# Altium PCB PCB_TESIS.PcbDoc
Units mm, origin at the board's own origin, x right, y up, seen from the top; angles counter-clockwise.
Board outline 100 x 100 mm, 2 copper layers (Top Layer, Bottom Layer), stack 1.671 mm thick; 46 components, 40 nets, 168 pads, 0 vias.
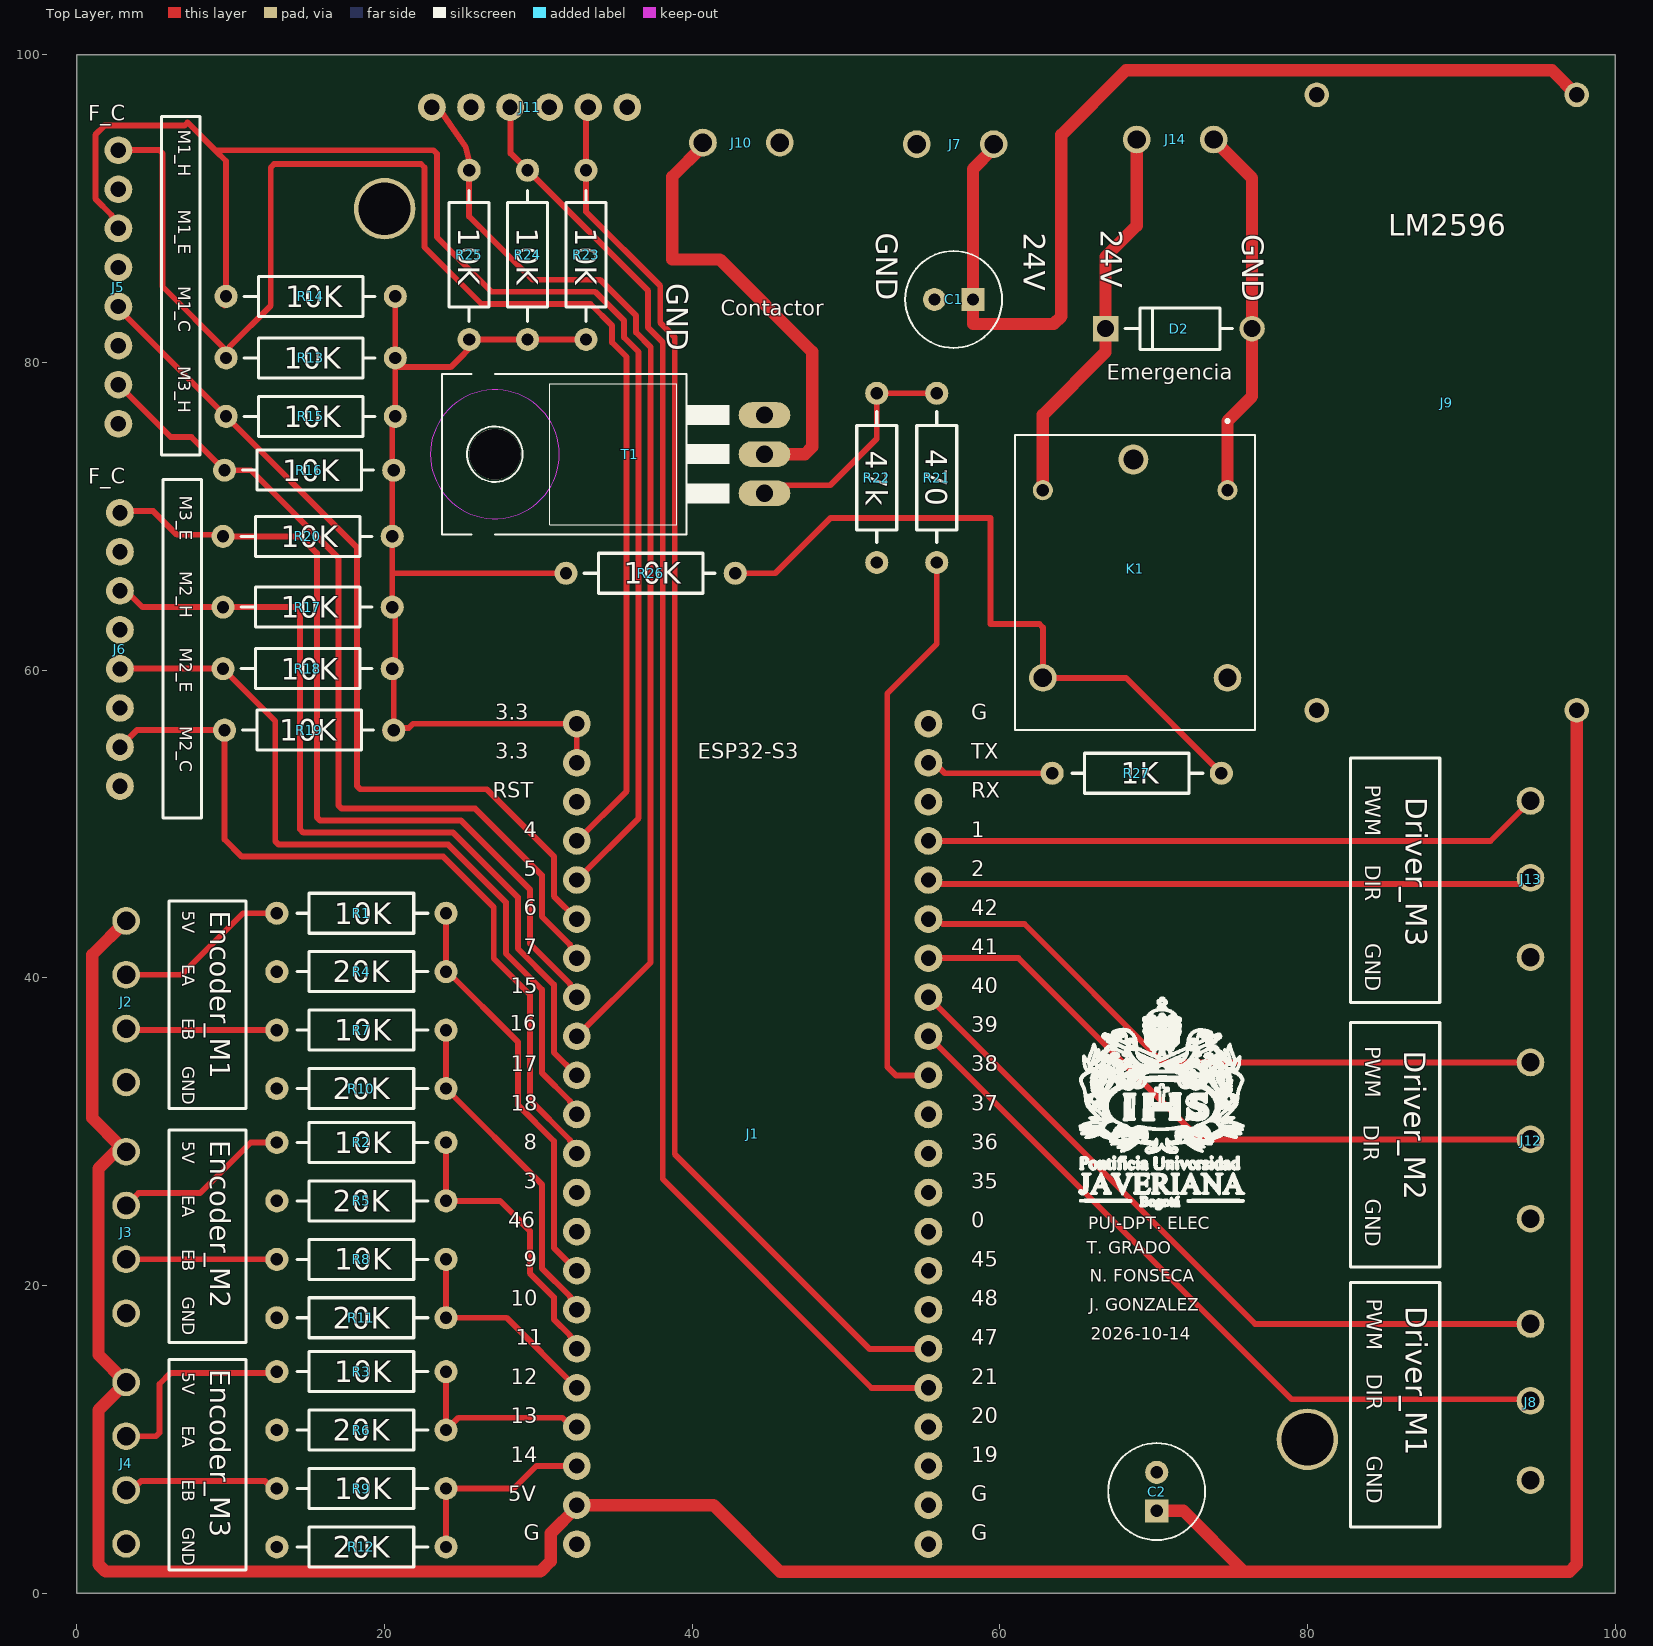
[diagram p0: Top Layer view]
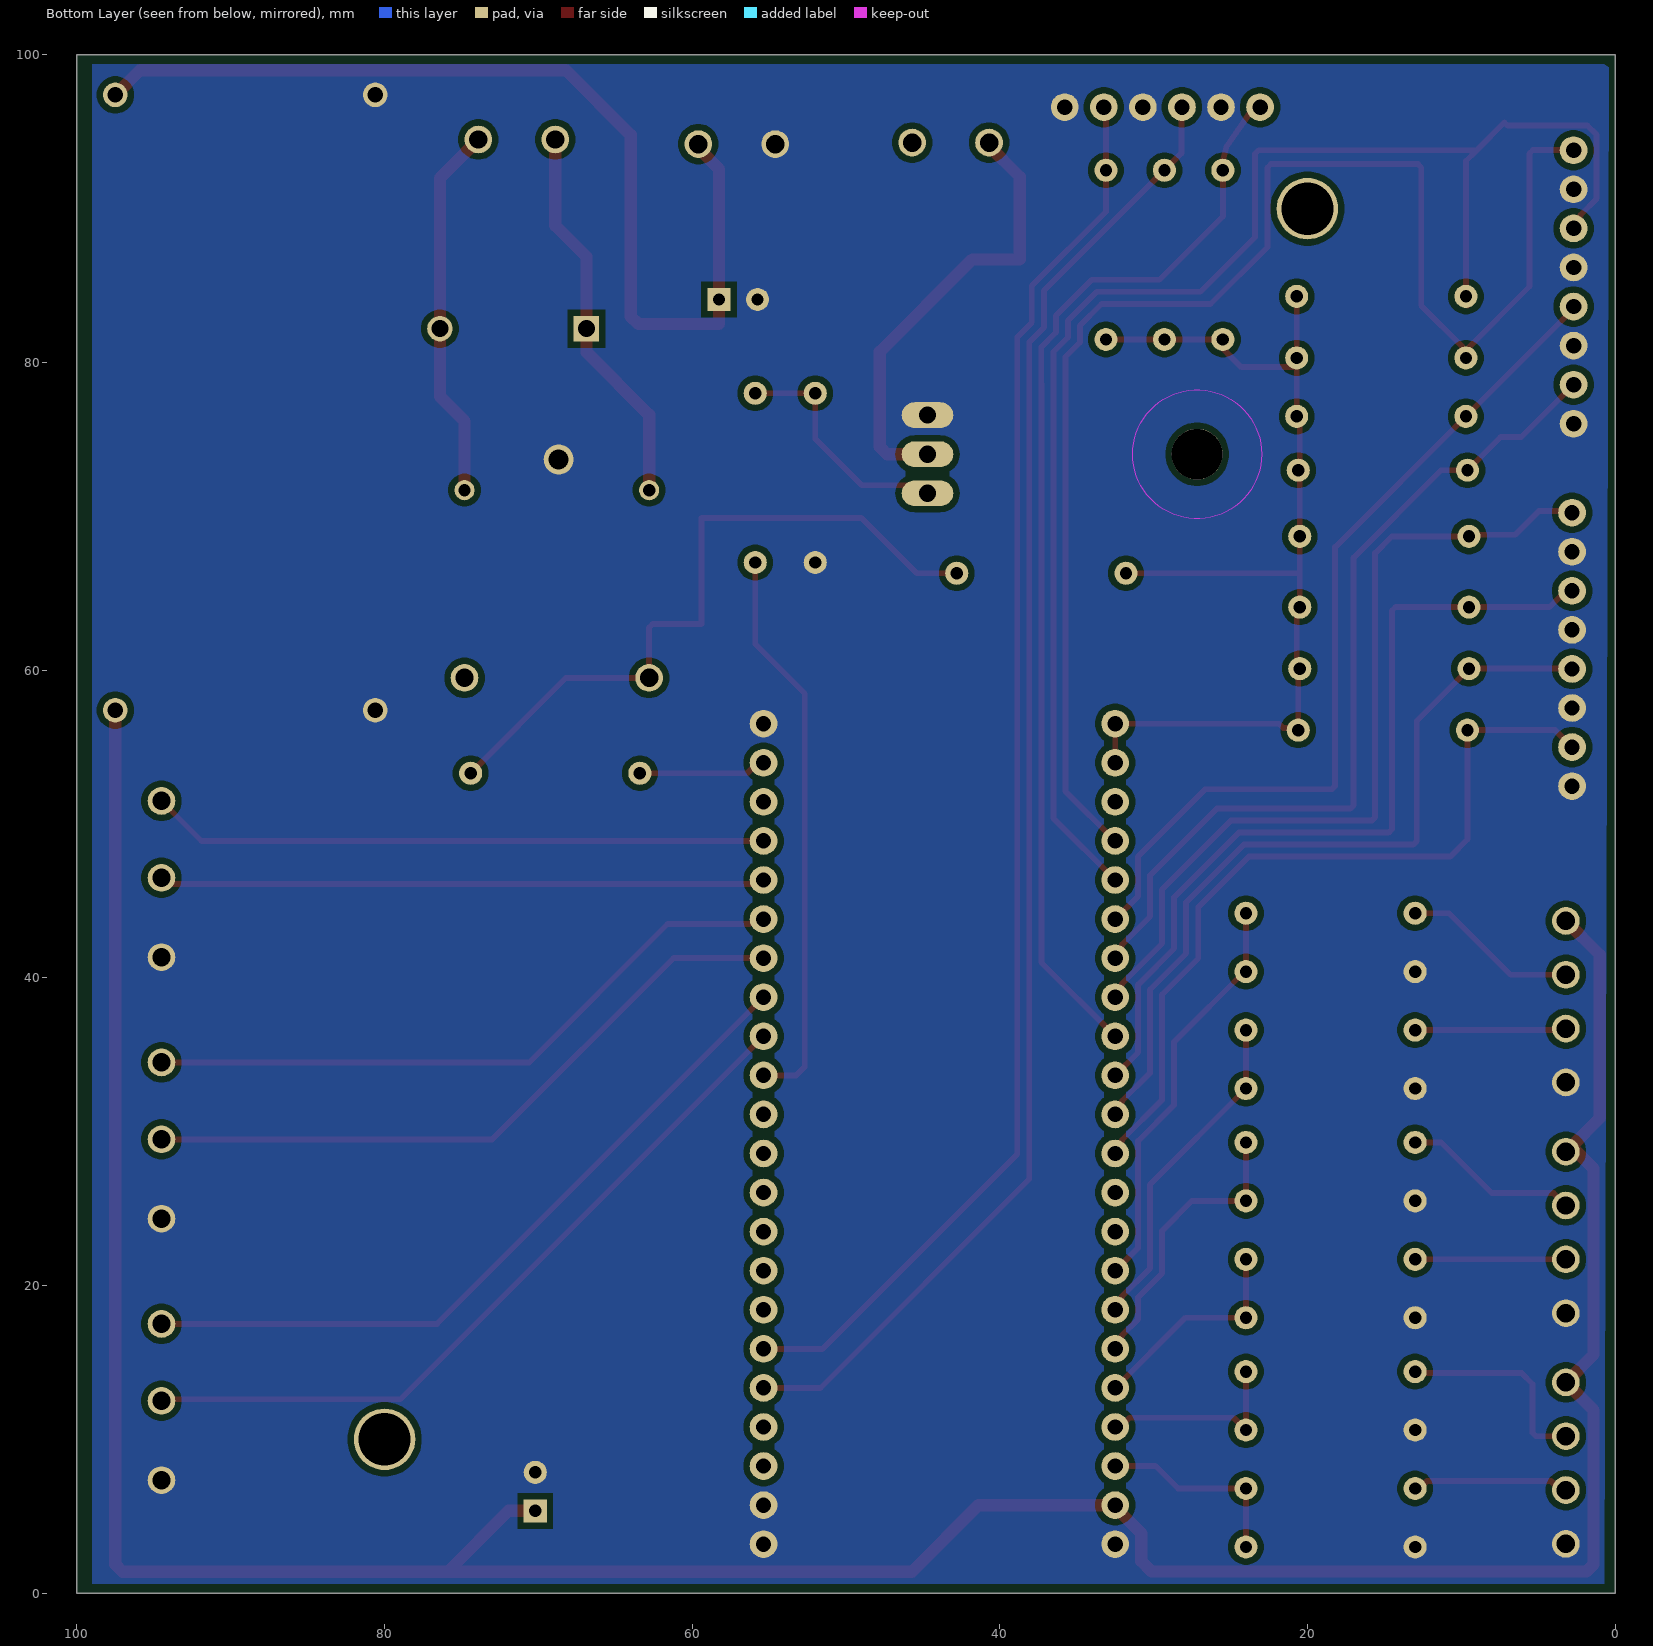
[diagram p1: Bottom Layer view, seen from below]

## Layer stack, top to bottom
Top Solder: solder mask 0.0102, Solder Resist, Dk 3.5
Top Layer: signal copper 0.0356
Dielectric 1: dielectric 1.6, FR-4, Dk 4.8
Bottom Layer: signal copper 0.0356
Bottom Solder: solder mask 0.0102, Solder Resist, Dk 3.5

## Board outline
0,0 0,100 100,100 100,0

## Design rules (kind name [scope] priority, off if disabled: settings)
BoardOutlineClearance [All] p1: gap=0.254 ignorepadtopadclearanceinfootprint=FALSE
Clearance [All] p1: gap=0.4 ignorepadtopadclearanceinfootprint=FALSE
HoleSize [All] p1: absolutevalues=TRUE maxlimit=6 minlimit=0.4 maxpercent=80.000 minpercent=20.000
MinimumAnnularRing [All] p1: minimumring=0.254
PlaneConnect [All] p1: planeconnectstyle=Direct reliefexpansion=0.508 reliefentries=4 reliefconductorwidth=0.254 reliefairgap=0.254
PolygonConnect [All] p1: connectstyle=Direct reliefconductorwidth=0.4 reliefentries=4 polygonreliefangle="90 Angle" airgapwidth=0.4
RoutingLayers [All] p1: top layer_v5=TRUE bottom layer_v5=FALSE
RoutingVias [All] p1: holewidth=0.711 width=1.27 viastyle="Through Hole" minholewidth=0.711 minwidth=1.27 maxholewidth=0.711 maxwidth=1.27
SolderMaskExpansion [All] p1: expansion=0.102 istentingtop=FALSE
SupplyNets "Schematic Supply Nets_5" [InNet('GND_F')] p1: voltage=0.000
SupplyNets "Schematic Supply Nets_1" [InNet('VCC 24V_F')] p2: voltage=0.000
SupplyNets "Schematic Supply Nets_3" [InNet('VCC 24V')] p3: voltage=0.000
SupplyNets "Schematic Supply Nets_4" [InNet('GND')] p4: voltage=0.000
SupplyNets "Schematic Supply Nets_2" [InNet('+3.3')] p5: voltage=0.000
SupplyNets "Schematic Supply Nets" [InNet('+5')] p6: voltage=0.000
UnRoutedNet [All] p1: checkbadconnections=TRUE
Width [All] p1: maxlimit=0.8 minlimit=0.3 preferedwidth=0.4
Width Width_power [InNet('VCC 24V') Or InNet('+5')] p2: maxlimit=1.2 minlimit=0.6 preferedwidth=0.8 minimp=50.000000 maximp=50.000000 favimp=50.000000
26 further rules are at their usual default settings.

## Components (designator, comment, footprint, x,y, rotation, side; value= is the part's Value field where it differs from the comment)
C1 "47uF" CAPPRD250W50D630H1120 57,84.1 r180 top
C2 "47uF" CAPPRD250W50D630H1120 70.2,6.6 r90 top
D2 "1N4007" DIOAD1060W80L520D270 71.7,82.2 r0 top
J1 "Esp32-S3" FOOTPRINTESP 32.5,56.52 r0 top
J2 "Encoder_M1" BORNERA4_3.5MM 3.2,33.2 r180 top
J3 "Encoder_M2" BORNERA4_3.5MM 3.2,18.2 r180 top
J4 "Encoder_M3" BORNERA4_3.5MM 3.2,3.2 r180 top
J5 "Finales de carrera" "FOOTPRINT BORNERA 8 PINS" 2.7,93.8 r0 top
J6 "Finales de carrera" "FOOTPRINT BORNERA 8 PINS" 2.8,70.24 r0 top
J7 "Alimentacion" "BORNERA 2 5MM" 59.6,94.2 r270 top
J8 "Driver_M1" "BORNERA 3 5MM" 94.5,17.5 r0 top
J9 "BUCK_LM2596" BUCK_LM2596 80.6,97.4 r0 top
J10 "Contactor" "BORNERA 2 5MM" 45.7,94.3 r270 top
J11 "Botones" "FOOTPRINT BORNERA 6" 23.08,96.6 r90 top
J12 "Driver_M2" "BORNERA 3 5MM" 94.5,34.5 r0 top
J13 "Driver_M3" "BORNERA 3 5MM" 94.5,51.5 r0 top
J14 "Bornera_Fusibles" "Bornera 2 5mm" 68.9,94.5 r90 top
K1 "SRD-24VDC-SL-C" RELAY_SRD-12VDC-SL-C 68.8,65.6 r270 top
R1 "10K" RESAD1100W55L680D260 18.5,44.2 r0 top
R2 "10K" RESAD1100W55L680D260 18.5,29.3 r0 top
R3 "10K" RESAD1100W55L680D260 18.5,14.4 r0 top
R4 "20K" RESAD1100W55L680D260 18.5,40.4 r0 top
R5 "20K" RESAD1100W55L680D260 18.5,25.5 r0 top
R6 "20K" RESAD1100W55L680D260 18.5,10.6 r0 top
R7 "10K" RESAD1100W55L680D260 18.5,36.6 r0 top
R8 "10K" RESAD1100W55L680D260 18.5,21.7 r0 top
R9 "10K" RESAD1100W55L680D260 18.5,6.8 r0 top
R10 "20K" RESAD1100W55L680D260 18.5,32.8 r0 top
R11 "20K" RESAD1100W55L680D260 18.5,17.9 r0 top
R12 "20K" RESAD1100W55L680D260 18.5,3 r0 top
R13 "10K" RESAD1100W55L680D260 15.2,80.3 r180 top
R14 "10K" RESAD1100W55L680D260 15.2,84.3 r180 top
R15 "10K" RESAD1100W55L680D260 15.2,76.5 r180 top
R16 "10K" RESAD1100W55L680D260 15.1,73 r180 top
R17 "10K" RESAD1100W55L680D260 15,64.1 r180 top
R18 "10K" RESAD1100W55L680D260 15,60.1 r180 top
R19 "10K" RESAD1100W55L680D260 15.1,56.1 r180 top
R20 "10K" RESAD1100W55L680D260 15,68.7 r180 top
R21 "470" RESAD1100W55L680D260 55.9,72.5 r90 top
R22 "47k" RESAD1100W55L680D260 52,72.5 r90 top
R23 "10K" RESAD1100W55L680D260 33.1,87 r270 top
R24 "10K" RESAD1100W55L680D260 29.3,87 r270 top
R25 "10K" RESAD1100W55L680D260 25.5,87 r270 top
R26 "10K" RESAD1100W55L680D260 37.3,66.3 r180 top
R27 "1K" RESAD1100W55L680D260 68.9,53.3 r0 top
T1 "TIP122" TO220 38.35,74.04 r90 top

## Footprints (in the part's own frame and the unit in brackets; to place one, negate y for a bottom-side part, rotate by r counter-clockwise, add the part's x,y. Pads: shape width x height; smd on the part's side, far side on the other; paste and mask are expansions set on the pad)
BORNERA4_3.5MM [mm] "header 22 pads"
  round 1.8 hole 1.2: 1(0,0) 2(0,-3.5) 3(0,-7) 4(0,-10.5)
  body extent -3.4,-12.4 3.4,1.9, height 8.4
"BORNERA 2 5MM" [mm] "header 22 pads"
  round 1.8 hole 1.2: 1(0,0) 2(0,-5)
  body extent -5.75,-7.61 5.45,3.1, height 18
"Bornera 2 5mm" [mm] "header 22 pads"
  round 1.8 hole 1.2: 1(0,0) 2(0,-5)
  body extent -5.75,-7.61 5.45,3.1, height 18
"BORNERA 3 5MM" [mm] "header 22 pads"
  round 1.8 hole 1.2: 1(0,0) 2(0,-5) 3(0,-10.16)
  body extent -5.7,-13.15 5.5,2.64, height 18
BUCK_LM2596 [mm]
  round 1.6 hole 1: IN+(16.9,0) IN-(0,0) OUT+(16.9,-40) OUT-(0,-40)
  body extent -1.6,-41.5 18.4,1.5, height 16.29
CAPPRD250W50D630H1120 [mm]
  round 1.5 hole 0.8: N(1.25,0)
  rect 1.5x1.5 hole 0.8: P(-1.25,0)
  silkscreen extent -3.15,-3.15 3.15,3.15, body extent -3.15,-3.15 3.15,3.15, height 11.2
DIOAD1060W80L520D270 [mm]
  round 1.65 hole 1.1 mask+0.102: A(4.699,0)
  rect 1.65x1.65 / inner round 1.65 / far side rect 1.65x1.65 hole 1.1 mask+0.102: C(-4.826,0)
  silkscreen extent -3.56,-1.35 3.43,1.35, body extent -5.29,-1.36 5.29,1.36, height 2.71
"FOOTPRINT BORNERA 6" [mm] "header 22 pads"
  round 1.8 hole 1: 1(0,0) 2(0,-2.54) 3(0,-5.08) 4(0,-7.62) 5(0,-10.16) 6(0,-12.7)
  body extent -3,-14.22 3.5,1.42, height 8.5
"FOOTPRINT BORNERA 8 PINS" [mm] "Footprint bornera 8 pins"
  round 1.8 hole 1: 1(0,0) 2(0,-2.54) 3(0,-5.08) 4(0,-7.62) 5(0,-10.16) 6(0,-12.7) 7(0,-15.24) 8(0,-17.78)
  body extent -3,-19.26 3.5,1.46, height 8.5
FOOTPRINTESP [mm] "header ESP-S3"
  round 1.8 hole 1: 1(0,0) 2(0,-2.54) 3(0,-5.08) 4(0,-7.62) 5(0,-10.16) 6(0,-12.7) 7(0,-15.24) 8(0,-17.78) 9(0,-20.32) 10(0,-22.86) 11(0,-25.4) 12(0,-27.94) 13(0,-30.48) 14(0,-33.02) 15(0,-35.56) 16(0,-38.1) 17(0,-40.64) 18(0,-43.18) 19(0,-45.72) 20(0,-48.26) 21(0,-50.8) 22(0,-53.34) 23(22.86,0) 24(22.86,-2.54) 25(22.86,-5.08) 26(22.86,-7.62) 27(22.86,-10.16) 28(22.86,-12.7) 29(22.86,-15.24) 30(22.86,-17.78) 31(22.86,-20.32) 32(22.86,-22.86) 33(22.86,-25.4) 34(22.86,-27.94) 35(22.86,-30.48) 36(22.86,-33.02) 37(22.86,-35.56) 38(22.86,-38.1) 39(22.86,-40.64) 40(22.86,-43.18) 41(22.86,-45.72) 42(22.86,-48.26) 43(22.86,-50.8) 44(22.86,-53.34)
  body extent -1.3,-61.96 24.1,7.68, height 16.29
RELAY_SRD-12VDC-SL-C [mm]
  round 1.308 hole 0.8: COIL1(-6.1,6) COIL2(-6.1,-6)
  round 1.95 hole 1.3: COM(-8.1,-0.12)
  round 1.8 hole 1.2: NC(6.1,6) NO(6.1,-6)
  silkscreen extent -10.7,-7.8 9.5,7.8, body extent -9.6,-7.8 9.6,7.8, height 15.8
RESAD1100W55L680D260 [mm]
  round 1.5 hole 0.8: 1(-5.5,0) 2(5.5,0)
  silkscreen extent -4.19,-1.3 4.32,1.3, body extent -5.77,-1.2 5.77,1.2, height 2.4
TO220 [mil]
  oval 66x132 hole 44: 1(-100,-250) 2(0,-250) 3(100,-250)
  round 130 hole 130 unplated: ""(0,440)
  Keep-Out Layer circle w0: c0,440 r165
  Keep-Out Layer circle w0: c0,440 r165
  silkscreen extent -205,-160 205,575, body extent -202,-318 195,-142, height 781

## Part data
C1 C2: library part ECA1HM470, "47ÂµF 50V Aluminum Electrolytic Capacitors Radial, Can 2000 Hrs @ 85Â°C", Package="RADIAL-2 Panasonic", Availability="In Stock", Check_prices=https://www.snapeda.com/parts/ECA1HM470/Panasonic%20Electronic%20Components/view-part/562975/?ref=eda, MF="Panasonic Electronic", MP=ECA1HM470, Price=None, Purchase-URL=https://pricing.snapeda.com/search/part/ECA1HM470/?ref=eda, SnapEDA_Link=https://www.snapeda.com/parts/ECA1HM470/Panasonic%20Electronic%20Components/view-part/562975/?ref=snap
D2: "Diode, DO-41, 1000V, 1A, 175Â°C", Package="DO-41 Diotec", Check_prices=https://www.snapeda.com/parts/1N4007/Diotec/view-part/?ref=eda, MF="Diotec Semiconductor", MP=1N4007, SnapEDA_Link=https://www.snapeda.com/parts/1N4007/Diotec/view-part/?ref=snap
J1: library part ESP32-S3
J2 J3 J4: library part Bornera4_3.5mm
J5 J6: library part Bornera8
J7 J10 J14: library part Bornera2_5mm
J8 J12 J13: library part Bornera3_5mm
J11: library part Bornera6
K1: library part SRD-12VDC-SL-C, "General Purpose Non Latching 12VDC SPDT Through Hole Relays RoHS", Package="NON STANDARD-5 Songle Relay", Check_prices=https://www.snapeda.com/parts/SRD-12VDC-SL-C/Songle+Relay/view-part/?ref=eda, MF="Songle Relay", MP=SRD-12VDC-SL-C, SnapEDA_Link=https://www.snapeda.com/parts/SRD-12VDC-SL-C/Songle+Relay/view-part/?ref=snap
R1 R2 R3 R4 R5 R6 R7 R8 R9 R10 R11 R12 R13 R14 R15 R16 R17 R18 R19 R20 R23 R24 R25 R26: "10.2 kOhms Â±1% 0.25W, 1/4W Through Hole Resistor Axial - Metal Film", Package="RADIAL-2 YAGEO", Check_prices=https://www.snapeda.com/parts/MFR-25FBF52-10K/Yageo/view-part/?ref=eda, MF=Yageo, MP=MFR-25FBF52-10K, SnapEDA_Link=https://www.snapeda.com/parts/MFR-25FBF52-10K/Yageo/view-part/?ref=snap
R21: library part 220, "10.2 kOhms Â±1% 0.25W, 1/4W Through Hole Resistor Axial - Metal Film", Package="RADIAL-2 YAGEO", Check_prices=https://www.snapeda.com/parts/MFR-25FBF52-10K/Yageo/view-part/?ref=eda, MF=Yageo, MP=MFR-25FBF52-10K, SnapEDA_Link=https://www.snapeda.com/parts/MFR-25FBF52-10K/Yageo/view-part/?ref=snap
R22 R27: library part 10K, "10.2 kOhms Â±1% 0.25W, 1/4W Through Hole Resistor Axial - Metal Film", Package="RADIAL-2 YAGEO", Check_prices=https://www.snapeda.com/parts/MFR-25FBF52-10K/Yageo/view-part/?ref=eda, MF=Yageo, MP=MFR-25FBF52-10K, SnapEDA_Link=https://www.snapeda.com/parts/MFR-25FBF52-10K/Yageo/view-part/?ref=snap
T1: "Bipolar (BJT) Transistor NPN - Darlington 100 V 5 A - 2 W Through Hole TO-220-3", Package="TO-220-3 ON Semiconductor", Check_prices=https://www.snapeda.com/parts/TIP122/Onsemi/view-part/?ref=eda, MF="ON Semiconductor", MP=TIP122, SnapEDA_Link=https://www.snapeda.com/parts/TIP122/Onsemi/view-part/?ref=snap

## Free pads (board coordinates)
  round 4 hole 3.4: 1(20,90) 1(80,10)

## Nets (pads, with @x,y where several pads share a name; then routed paths per layer and width w, separated by ;. In a path a pad name is that pad's centre, name@x,y a point inside that pad or via, vN(x,y) a via of type N, cw(c..) or ccw(c..) an arc to the next point about the centre after c; other vN are vias at no path point)
+3.3: J1.1 J1.2 R13.1 R14.1 R15.1 R16.1 R17.1 R18.1 R19.1 R20.1 R23.2 R24.2 R25.2 R26.2 | length 68.4
  Top Layer w0.381: R19.1@20.019,56.097 R19.1@20.435,55.681 ; R14.1@20.35,84.75 R14.1@20.4,84.7 ; R13.1@20.5,79.923 R13.1@20.7,79.723 ; R14.1 R13.1 R13.1@20.7,79.723 ; R26.2 20.6,66.3 20.5,66.4 ; J1.2 J1.1 21.857,56.52 21.572,56.235 20.735,56.235 R19.1 20.6,56.235 20.6,60 R18.1 20.7,60.3 20.7,63.9 R17.1 20.5,66.4 ; R23.2@32.85,81.25 32.6,81.5 R24.2 26.1,81.5 24.3,79.7 20.723,79.7 R13.1@20.7,79.723 ; 20.5,66.4 R20.1 20.5,73 20.5,76.5 20.698,76.698 20.698,78.798 20.7,78.8 R13.1@20.7,79.723
+5: C2.P J1.21 J2.4 J3.4 J4.4 J9.OUT+ | length 210
  Top Layer w0.8: J3.4@2.85,29.05 J3.4@2.845,29.045 ; J3.4 3.19,28.7 J3.4@2.845,29.045 ; J2.4 1,41.5 1,30.89 J3.4@2.845,29.045 ; C2.P 71.931,5.35 75.891,1.39 ; J9.OUT+@97.5,57.194 97.5,1.859 97.031,1.39 75.891,1.39 ; J3.4@2.845,29.045 1.4,27.6 1.4,15.5 J4.4 1.4,11.9 1.4,1.869 1.869,1.4 30.131,1.4 30.8,2.069 30.8,3.884 32.5,5.584 J1.21 41.38,5.72 45.71,1.39 75.891,1.39
+FC_M1_C: J1.6 J5.5 R15.2 | length 57.1
  Top Layer w0.381: J5.5@2.7,83.66 2.7,83.5 R15.2 ; R15.2@9.6,76.6 18.2,68 18.2,52.483 18.423,52.259 26.647,52.259 31.009,47.897 31.009,45.31 J1.6
+FC_M1_E: J1.5 J5.3 R14.2 | length 98.7
  Top Layer w0.381: J5.3 2.7,89.104 2.257,89.547 2.257,89.596 1.2,90.652 1.2,94.8 1.8,95.4 7,95.4 7.2,95.6 9,93.8 ; R14.2@9.2,84.1 R14.2@9.607,83.693 ; R14.2 9.7,93.1 9,93.8 ; J1.5 36.519,50.379 36.519,78.919 36.521,78.921 36.521,80.679 35.577,81.623 35.577,82.714 33.691,84.6 26.958,84.6 23.4,88.158 23.4,91.3 23.409,91.309 23.409,93.577 23.186,93.8 9,93.8
+FC_M1_H: J1.4 J5.1 R13.2 | length 96.1
  Top Layer w0.381: J5.1@2.7,93.82 5.337,93.82 5.561,93.597 5.561,84.939 R13.2@9.7,80.8 ; R13.2 R13.2@9.7,80.8 ; J1.4 35.738,52.138 35.738,79.242 35.741,79.245 35.741,80.355 34.796,81.3 34.796,82.391 33.387,83.8 26.3,83.8 22.6,87.5 22.6,92.677 22.377,92.9 12.823,92.9 12.6,92.677 12.6,83.7 9.914,81.014 9.914,80.817 9.897,80.8 R13.2@9.7,80.8
+FC_M2_C: J1.12 J6.7 R19.2 | length 51.9
  Top Layer w0.381: J6.7 3.9,56.1 R19.2 9.6,49 10.724,47.876 23.815,47.876 27.105,44.586 27.105,41.254 29.447,38.911 29.447,32.065 32.057,29.456 32.057,29.407 32.5,28.964 J1.12
+FC_M2_E: J1.11 J6.5 R18.2 | length 51.9
  Top Layer w0.381: J6.5@2.94,60.34 3.18,60.1 R18.2 ; R18.2@9.765,60.1 R18.2 ; J1.11 32.5,31.504 32.057,31.947 32.057,31.996 30.228,33.824 30.228,39.235 27.886,41.578 27.886,44.91 24.138,48.657 13.123,48.657 12.9,48.88 12.9,56.7 R18.2
+FC_M2_H: J1.10 J6.3 R17.2 | length 55.5
  Top Layer w0.381: J6.3@3,65.36 4.26,64.1 R17.2 14.277,64.1 14.5,63.877 14.5,49.661 14.723,49.438 24.462,49.438 28.667,45.233 28.667,41.901 31.009,39.558 31.009,35.15 J1.10
+FC_M3_E: J1.8 J6.1 R20.2 | length 55.2
  Top Layer w0.381: J6.1@2.8,70.34 4.96,70.34 6.5,68.8 9.1,68.8 9.2,68.7 14.51,68.7 15.6,67.61 15.6,50.442 15.823,50.219 24.981,50.219 29.448,45.752 29.448,42.225 32.057,39.616 32.057,39.567 32.5,39.124 J1.8
+FC_M3_H: J1.7 J5.7 R16.2 | length 56.5
  Top Layer w0.381: J5.7 6.1,75.16 7.44,75.16 R16.2 11.315,73 17,67.315 17,51.223 17.223,51 25.9,51 30.228,46.672 30.228,43.984 32.057,42.156 32.057,42.107 32.5,41.664 J1.7
-A2_Contactor: J10.2 T1.2 | length 29.5
  Top Layer w0.8: J10.2 40.7,94.073 38.701,92.074 38.701,86.7 41.8,86.7 47.8,80.7 47.8,74.509 47.331,74.04 T1.2
Contactor: J1.32 R21.1 | length 37
  Top Layer w0.381: J1.32 53.24,33.66 52.681,34.219 52.681,58.481 55.9,61.7 R21.1
Cubierta: J1.39 J11.5 R23.1 | length 92.2
  Top Layer w0.381: J11.5 33.1,96.46 33.1,89.804 37.92,84.984 37.92,82.594 38.864,81.649 38.864,28.536 51.52,15.88 J1.39
DIR_M1: J1.31 J8.2 | length 49
  Top Layer w0.381: J1.31 78.96,12.6 94.4,12.6 J8.2
DIR_M2: J1.29 J12.2 | length 44
  Top Layer w0.381: J1.29 61.22,41.28 73,29.5 J12.2
DIR_M3: J1.27 J13.2 | length 39.4
  Top Layer w0.381: J1.27 55.62,46.1 93.716,46.1 94.116,46.5 J13.2
EA_M1: J1.15 R1.2 R4.2 | length 26.8
  Top Layer w0.381: R1.2 24,40.503 28.666,35.836 28.666,31.741 31.009,29.398 31.009,22.45 J1.15
EA_M1_5V: J2.3 R1.1 | length 11.5
  Top Layer w0.381: J2.3 6.8,40.2 10.8,44.2 R1.1
EA_M2: J1.17 R2.2 R5.2 | length 19
  Top Layer w0.381: R2.2 R5.2 27.5,25.5 29.448,23.553 29.448,20.8 31.009,19.238 31.009,17.803 32.057,16.756 32.057,16.707 32.5,16.264 J1.17
EA_M2_5V: J3.3 R2.1 | length 11.5
  Top Layer w0.381: J3.3 4,26 8,26 11.3,29.3 R2.1
EA_M3: J1.19 R3.2 R6.2 | length 12.9
  Top Layer w0.381: R3.2 R6.2 24.8,11.4 31.567,11.4 32.167,10.8 J1.19
EA_M3_5V: J4.3 R3.1 | length 13.4
  Top Layer w0.381: J4.3 5.144,10.2 5.367,10.423 5.367,13.6 6.067,14.3 R3.1@13,14.3
EB_M1: J1.16 R7.2 R10.2 | length 21.7
  Top Layer w0.381: R7.2 R10.2 30.228,26.572 30.228,21.124 32.057,19.296 32.057,19.247 32.5,18.804 J1.16
EB_M1_5V: J2.2 R7.1 | length 10.2
  Top Layer w0.381: J2.2@3.17,36.6 R7.1@13.323,36.6
EB_M2: J1.18 R8.2 R11.2 | length 14.2
  Top Layer w0.381: R8.2 R11.2 27.94,17.9 J1.18
EB_M2_5V: J3.2 R8.1 | length 9.8
  Top Layer w0.381: J3.2 R8.1
EB_M3: J1.20 R9.2 R12.2 | length 12.4
  Top Layer w0.381: R12.2 R9.2 ; R9.2@24.457,6.8 28.409,6.8 29.869,8.26 J1.20
EB_M3_5V: J4.2 R9.1 | length 10.3
  Top Layer w0.381: J4.2 3.584,6.7 4.184,7.3 12.217,7.3 12.717,6.8 R9.1
GND: C1.N C2.N J1.22 J1.23 J1.43 J1.44 J2.1 J3.1 J4.1 J5.2 J5.4 J5.6 J5.8 J6.2 J6.4 J6.6 J6.8 J7.2 J8.3 J9.IN- J9.OUT- J11.2 J11.4 J11.6 J12.3 J13.3 K1.COM R4.1 R5.1 R6.1 R10.1 R11.1 R12.1 R22.1 T1.3
GND_F: D2.A J14.2 K1.COIL1 | length 24.5
  Top Layer w0.8: J14.2 76.399,92.001 76.399,84.5 76.399,77.799 74.8,76.2 K1.COIL1
NetJ1_24: J1.24 R27.1 | length 8.3
  Top Layer w0.381: J1.24 55.744,53.98 56.424,53.3 R27.1
NetR21_2: R21.2 R22.2 T1.1 | length 15.4
  Top Layer w0.381: T1.1@44.7,72.02 48.98,72.02 52,75.04 R22.2 R21.2
P_Emergencia: K1.NO R26.1 R27.2 | length 45.9
  Top Layer w0.381: R26.1 45.4,66.3 49,69.9 59.4,69.9 59.4,63 62.577,63 62.8,62.777 K1.NO 68.2,59.5 R27.2
PWM_M1: J1.30 J8.1 | length 47.9
  Top Layer w0.381: J1.30 76.6,17.5 J8.1
PWM_M2: J1.28 J12.1 | length 43
  Top Layer w0.381: J1.28 55.632,43.548 56.244,43.548 56.293,43.5 61.6,43.5 70.6,34.5 J12.1
PWM_M3: J1.26 J13.1 | length 40.2
  Top Layer w0.381: J1.26 91.9,48.9 J13.1
START: J1.9 J11.1 R25.1 | length 70.8
  Top Layer w0.381: J11.1 23.495,96.526 23.604,96.417 25.279,94.013 25.5,93.073 25.5,89.5 29.619,85.381 34.015,85.381 36.358,83.038 36.358,81.947 37.302,81.002 37.302,78.598 37.3,78.595 37.3,41 J1.9
STOP: J1.40 J11.3 R24.1 | length 96.8
  Top Layer w0.381: J11.3@28.2,96.702 28.2,93.6 37.139,84.661 37.139,82.27 38.083,81.326 38.083,79.966 38.083,26.917 51.66,13.34 J1.40
"VCC 24V": C1.P J7.1 J9.IN+ | length 65.9
  Top Layer w0.8: J7.1 59.6,93.93 58.25,92.58 C1.P 58.25,82.5 63.5,82.5 64,83 64,94.8 68.2,99 95.9,99 J9.IN+
"VCC 24V_F": D2.C J14.1 K1.COIL2 | length 25.3
  Top Layer w0.8: K1.COIL2 62.8,76.6 66.874,80.674 66.874,84.5 66.874,86.874 68.9,88.9 J14.1
pads on no net: J1.3 J1.13 J1.14 J1.25 J1.33 J1.34 J1.35 J1.36 J1.37 J1.38 J1.41 J1.42 J10.1 K1.NC T1.

## Polygon pours and split planes (outlines as drawn)
GND on Bottom Layer "GND_L02_P000" (solid, pour order 0): 0.4,99.6 0.6,99.4 99,99.4 99,0.6 0.7,0.6

## Silkscreen, mask and mechanical layers (free items; w line width, h text height)
Top Overlay:
  drawing of 11119 lines, arcs and shapes, not listed
  text "F_C" at 0.754,95.721 h1
  text "M1_H" at 6.587,95.146 h0.8 r270
  text "M1_E" at 6.587,89.946 h0.8 r270
  text "24V" at 66.554,88.646 h1.4 r270
  text "GND" at 51.954,88.446 h1.4 r270
  text "24V" at 61.554,88.446 h1.4 r270
  text "GND" at 75.754,88.346 h1.4 r270
  text "LM2596" at 85.254,88.254 h1.4
  text "GND" at 38.354,85.146 h1.4 r270
  text "M1_C" at 6.587,84.946 h0.8 r270
  text "Contactor" at 41.854,83.054 h1
  text "M3_H" at 6.587,79.746 h0.8 r270
  text "Emergencia" at 66.954,78.887 h1
  text "F_C" at 0.754,72.121 h1
  text "M3_E" at 6.687,71.346 h0.8 r270
  text "M2_H" at 6.687,66.446 h0.8 r270
  text "M2_E" at 6.687,61.446 h0.8 r270
  text "M2_C" at 6.687,56.346 h0.8 r270
  text "PWM" at 83.754,52.546 h1 r270
  text "Driver_M3" at 86.387,51.746 h1.4 r270
  text "DIR" at 83.754,47.346 h1 r270
  text "Encoder_M1" at 8.671,44.346 h1.3 r270
  text "GND" at 83.754,42.246 h1 r270
  text "PWM" at 83.754,35.546 h1 r270
  text "Driver_M2" at 86.287,35.246 h1.4 r270
  text "DIR" at 83.654,30.446 h1 r270
  text "Encoder_M2" at 8.671,29.446 h1.3 r270
  text "GND" at 83.754,25.646 h1 r270
  text "PUJ-DPT. ELEC" at 65.754,23.654 h0.8
  text "T. GRADO" at 65.654,22.054 h0.8
  text "N. FONSECA" at 65.854,20.254 h0.8
  text "PWM" at 83.854,19.146 h1 r270
  text "Driver_M1" at 86.387,18.646 h1.4 r270
  text "J. GONZALEZ" at 65.817,18.372 h0.8
  text "2026-10-14" at 65.917,16.472 h0.8
  text "Encoder_M3" at 8.671,14.546 h1.3 r270
  text "DIR" at 83.854,14.246 h1 r270
  text "GND" at 83.854,8.946 h1 r270
Mechanical 1:
  lines w0.15: 0,100 100,100
  lines w0.254: 90,100 0,100 0,0 100,0 100,100

## Text inside footprints (layer, text, board x,y; h text height)
J1: Top Overlay "ESP32-S3" at 40.374,54.234 h1; Top Overlay "3.3" at 27.207,56.774 h1; Top Overlay "3.3" at 27.207,54.234 h1; Top Overlay "RST" at 27.04,51.694 h1; Top Overlay "4" at 29.04,49.154 h1; Top Overlay "5" at 29.04,46.614 h1; Top Overlay "6" at 29.04,44.074 h1; Top Overlay "7" at 29.04,41.534 h1; Top Overlay "15" at 28.206,38.994 h1; Top Overlay "16" at 28.146,36.554 h1; Top Overlay "17" at 28.206,33.914 h1; Top Overlay "18" at 28.206,31.374 h1; Top Overlay "8" at 29.04,28.834 h1; Top Overlay "3" at 29.04,26.294 h1; Top Overlay "46" at 28.04,23.754 h1; Top Overlay "9" at 29.04,21.214 h1; Top Overlay "10" at 28.206,18.674 h1; Top Overlay "11" at 28.54,16.134 h1; Top Overlay "12" at 28.206,13.594 h1; Top Overlay "13" at 28.206,11.054 h1; Top Overlay "14" at 28.206,8.514 h1; Top Overlay "5V" at 28.04,5.974 h1; Top Overlay "G" at 29.04,3.434 h1; Top Overlay "G" at 58.154,56.774 h1; Top Overlay "TX" at 58.154,54.234 h1; Top Overlay "RX" at 58.154,51.694 h1; Top Overlay "1" at 58.154,49.154 h1; Top Overlay "2" at 58.154,46.614 h1; Top Overlay "42" at 58.154,44.074 h1; Top Overlay "41" at 58.154,41.534 h1; Top Overlay "40" at 58.154,38.994 h1; Top Overlay "39" at 58.154,36.454 h1; Top Overlay "38" at 58.154,33.914 h1; Top Overlay "37" at 58.154,31.374 h1; Top Overlay "36" at 58.154,28.834 h1; Top Overlay "35" at 58.154,26.294 h1; Top Overlay "0" at 58.154,23.754 h1; Top Overlay "45" at 58.154,21.214 h1; Top Overlay "48" at 58.154,18.674 h1; Top Overlay "47" at 58.154,16.134 h1; Top Overlay "21" at 58.154,13.594 h1; Top Overlay "20" at 58.154,11.054 h1; Top Overlay "19" at 58.154,8.514 h1; Top Overlay "G" at 58.154,5.974 h1; Top Overlay "G" at 58.154,3.434 h1
J2: Top Overlay "GND" at 6.854,34.266 h0.8 r270; Top Overlay "5V" at 6.854,44.366 h0.8 r270; Top Overlay "EA" at 6.854,40.866 h0.8 r270; Top Overlay "EB" at 6.854,37.366 h0.8 r270
J3: Top Overlay "EB" at 6.854,22.366 h0.8 r270; Top Overlay "EA" at 6.854,25.866 h0.8 r270; Top Overlay "5V" at 6.854,29.366 h0.8 r270; Top Overlay "GND" at 6.854,19.266 h0.8 r270
J4: Top Overlay "GND" at 6.854,4.266 h0.8 r270; Top Overlay "5V" at 6.854,14.366 h0.8 r270; Top Overlay "EA" at 6.854,10.866 h0.8 r270; Top Overlay "EB" at 6.854,7.366 h0.8 r270
T1: Mechanical 13 "3" at 38.35,75.948 h1.27 r90; Mechanical 13 "2" at 38.35,73.404 h1.27 r90; Mechanical 13 "1" at 38.35,70.859 h1.27 r90